# Altium PCB PI5_Robo_Board_PCB.PcbDoc (part 3 of 3)
Units mm, origin at the board's own origin, x right, y up, seen from the top; angles counter-clockwise.
Board outline 98.8 x 131.2 mm, 4 copper layers (TOP1, SIG2, SIG3, BOT4), stack 1.399 mm thick; 219 components, 149 nets, 779 pads, 462 vias.
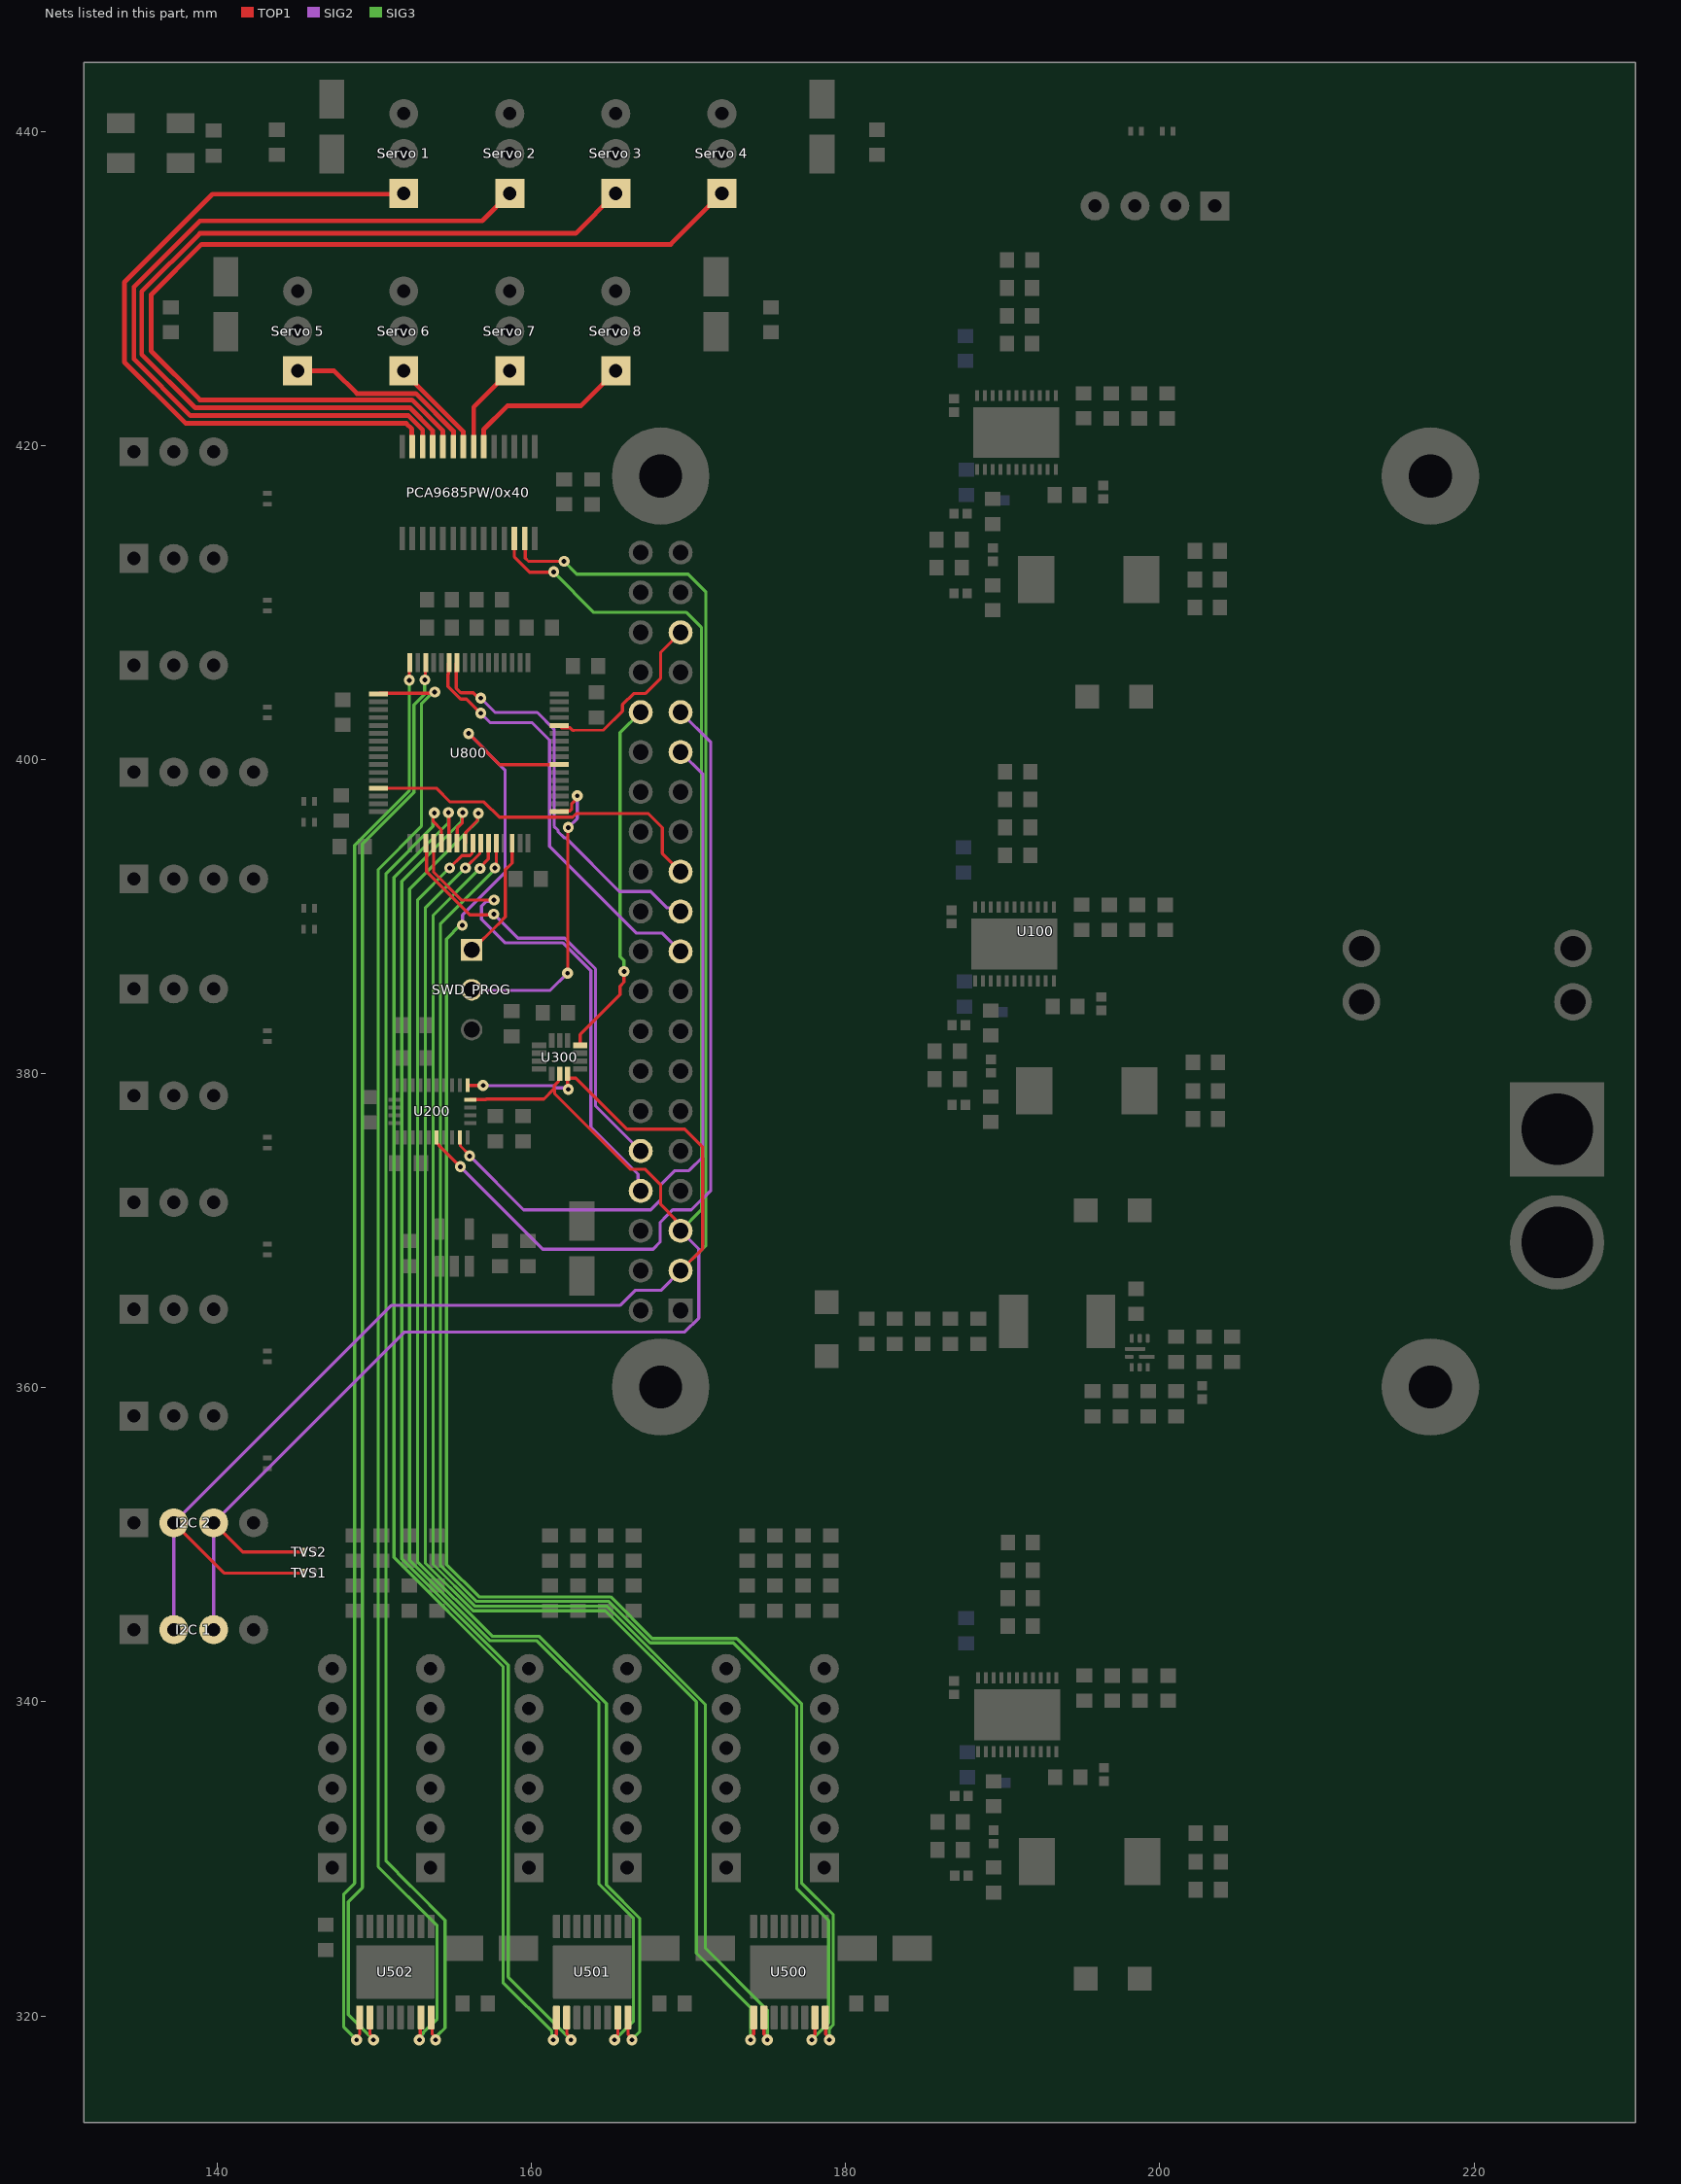
[diagram p5: the nets of this part, all layers, seen from the top]

## Via types
v1: diameter 0.7, hole 0.3, TOP1 to BOT4, tented both sides, 405 vias
v2: diameter 0.7, hole 0.3, TOP1 to BOT4, 57 vias

## Nets (pads, with @x,y where several pads share a name; then routed paths per layer and width w, separated by ;. In a path a pad name is that pad's centre, name@x,y a point inside that pad or via, vN(x,y) a via of type N, cw(c..) or ccw(c..) an arc to the next point about the centre after c; other vN are vias at no path point) (continued)
NetU100_8: U100.8 U800.36 | length 31.9
  TOP1 w0.2: U800.36@153.775,394.675 153.785,394.665 153.785,392.815 155.55,391.05 157.621,391.05 v1(157.623,391.052)
  SIG2 w0.2: v1(157.623,391.052) 157.528,390.957 157.107,390.957 156.825,390.675 156.825,389.831 158.331,388.325 162.017,388.325 163.795,386.547 163.795,376.602 166.795,373.602 166.795,372.705 U100.8@166.96,372.54
NetU100_10: U100.10 U800.35 | length 28
  TOP1 w0.2: U800.35@153.275,394.675 153.328,394.622 153.328,392.862 156.08,390.11 157.565,390.11 v1(157.608,390.153)
  SIG2 w0.2: v1(157.608,390.153) 157.622,390.153 159.15,388.625 162.128,388.625 164.085,386.668 164.085,377.955 U100.10@166.96,375.08
NetU100_19: U100.19 U800.11 | length 27.3
  TOP1 w0.2: U800.11@154.775,406.175 154.723,406.122 154.723,405.459 154.699,405.435 154.699,404.657 155.504,403.851 155.874,403.851 v1(156.775,402.95)
  SIG2 w0.2: v1(156.775,402.95) 157.375,402.35 160.044,402.35 161.158,401.236 161.158,394.479 166.695,388.942 168.338,388.942 U100.19@169.5,387.78
NetU100_21: U100.21 U800.10 | length 25.5
  TOP1 w0.2: U800.10@155.275,406.175 155.223,406.122 155.223,404.543 155.509,404.257 156.3,404.257 156.645,403.911 v1(156.781,403.911)
  SIG2 w0.2: v1(156.781,403.911) 157.692,403 160.375,403 161.448,401.927 161.448,395.752 161.7,395.5 161.7,395.403 162.081,395.022 162.178,395.022 165.6,391.6 167.6,391.6 168.646,390.554 169.266,390.554 U100.21@169.5,390.32
NetU100_23: U100.23 U800.29 | length 22.6
  TOP1 w0.2: U800.29@150.275,398.175 153.955,398.175 154.83,397.3 156.993,397.3 157.971,396.322 162.63,396.322 162.869,396.562 167.441,396.562 168.338,395.665 168.338,394.022 U100.23@169.5,392.86
NetU100_29: U100.29 U200.14 | length 46
  TOP1 w0.2: U200.14@155.458,375.936 155.483,375.911 155.483,375.395 156.063,374.814 v1(156.063,374.756)
  SIG2 w0.2: v1(156.063,374.756) 156.074,374.756 159.505,371.325 167.6,371.325 168.225,371.95 168.225,372.908 169.137,373.82 170.028,373.82 170.925,374.717 170.925,399.055 U100.29@169.5,400.48
NetU100_31: U100.31 U200.11 | length 54.1
  TOP1 w0.2: U200.11@153.958,375.936 153.983,375.911 153.983,375.599 154.133,375.449 154.133,375.416 154.653,374.896 154.654,374.896 v1(155.475,374.075)
  SIG2 w0.2: v1(155.475,374.075) 160.725,368.825 167.75,368.825 168.2,369.275 168.2,370.525 168.65,370.975 168.995,371.32 170.178,371.32 171.425,372.567 171.425,401.095 U100.31@169.5,403.02
NetU100_32: U100.32 U300.4 | length 22.9
  TOP1 w0.2: U300.4@163.11,381.88 163.11,382.485 165.65,385.025 165.65,385.573 165.9,385.823 v1(165.9,386.5)
  SIG3 w0.2: v1(165.9,386.5) 165.9,387.197 165.65,387.447 165.65,401.71 U100.32@166.96,403.02
NetU100_35: U100.35 U800.60 | length 11.6
  TOP1 w0.2: U800.60@161.775,402.175 161.829,402.122 161.927,402.027 162.455,402.027 162.623,401.859 162.707,401.859 164.597,401.885 165.8,403.088 165.8,403.5 166.088,403.788 cw(c166.96,403.02) 166.192,403.892 166.5,404.2 167.243,404.2 168.236,405.193 168.236,406.836 U100.35@169.5,408.1
NetU500_9: U500.9 U800.42 | length 92.6
  TOP1 w0.2: v1(155.8,393.1) 156.723,394.023 156.723,394.622 U800.42@156.775,394.675 ; v1@173.95,318.5 173.95,318.635 174.15,318.835 U500.9@174.15,319.9
  SIG3 w0.2: v1(155.8,393.1) 153.25,390.55 153.25,348.845 156.295,345.8 164.704,345.8 170.5,340.004 170.5,324 173.95,320.55 v1@173.95,318.5
  other v1: 173.95,318.475
NetU500_10: U500.10 U800.43 | length 92.9
  TOP1 w0.2: v1(156.73,393.07) 156.73,393.128 157.262,393.66 157.262,394.662 U800.43@157.275,394.675 ; U500.10@174.8,319.9 174.8,318.835 175.025,318.61 v1(175.025,318.475)
  SIG3 w0.2: v1(156.73,393.07) 153.75,390.09 153.75,348.755 156.415,346.09 164.824,346.09 171.075,339.839 171.075,328.128 171.075,324.325 175.025,320.375 v1(175.025,318.475)
NetU500_15: U500.15 U800.44 | length 97.9
  TOP1 w0.2: v1(157.674,393.1) 157.674,393.236 157.775,393.337 U800.44@157.775,394.675 ; v1(177.85,318.475) 177.85,318.61 178.05,318.81 U500.15@178.05,319.9
  SIG3 w0.2: v1(157.674,393.1) 157.674,392.984 154.21,389.52 154.21,348.705 156.521,346.394 164.93,346.394 167.574,343.75 172.85,343.75 176.9,339.7 176.9,328.1 178.925,326.075 178.925,319.55 v1(177.85,318.475)
NetU500_16: U500.16 U800.55 | length 112.2
  TOP1 w0.2: v1(156.01,401.66) 156.01,401.64 157.975,399.675 U800.55@161.775,399.675 ; U500.16@178.7,319.9 178.735,319.865 178.735,318.85 178.975,318.61 v1(178.975,318.475)
  SIG2 w0.2: v1(155.6,389.45) 155.625,389.475 155.625,390.1 158.325,392.8 158.325,399.344 v1(156.01,401.66)
  SIG3 w0.2: v1(155.6,389.45) 155.475,389.45 154.6,388.575 154.6,348.75 156.666,346.684 165.051,346.684 167.694,344.04 173.06,344.04 177.2,339.9 177.2,328.474 179.215,326.459 179.215,319.43 178.975,319.19 v1(178.975,318.475)
NetU501_9: U501.9 U800.38 | length 87.3
  TOP1 w0.2: v1(154.725,396.625) 154.75,396.6 154.75,394.7 U800.38@154.775,394.675 ; v1(161.4,318.475) 161.4,318.61 161.596,318.806 161.596,319.896 U501.9@161.6,319.9
  SIG3 w0.2: v1(154.725,396.625) 154.725,395.975 151.25,392.5 151.25,349.204 158.2,342.254 158.2,322.125 161.304,319.021 161.304,318.571 v1(161.4,318.475)
NetU501_10: U501.10 U800.39 | length 87.9
  TOP1 w0.2: U800.39@155.275,394.675 155.275,395.64 155.61,395.975 155.61,396.61 v1(155.625,396.625) ; U501.10@162.25,319.9 162.25,318.868 162.525,318.593 v1(162.525,318.475)
  SIG3 w0.2: v1(155.625,396.625) 155.565,396.565 155.565,396.065 151.75,392.25 151.75,349.114 158.525,342.339 158.525,322.475 v1(162.525,318.475)
NetU501_15: U501.15 U800.40 | length 91.8
  TOP1 w0.2: U800.40@155.775,394.675 155.828,394.727 155.828,395.378 156.565,396.115 156.565,396.515 v1(156.625,396.575) ; v1(165.3,318.475) 165.3,318.61 165.5,318.81 U501.15@165.5,319.9
  SIG3 w0.2: v1(156.625,396.575) 156.59,396.54 156.59,396.09 152.25,391.75 152.25,349.024 157.383,343.892 160.358,343.892 164.3,339.95 164.3,328.414 166.5,326.214 166.5,319.675 v1(165.3,318.475)
NetU501_16: U501.16 U800.41 | length 87.2
  TOP1 w0.2: v1(154.8,393.1) 155.578,393.878 156.083,393.878 156.223,394.017 156.223,394.622 U800.41@156.275,394.675 ; U501.16@166.15,319.9 166.15,318.85 166.4,318.6 v1@166.4,318.5
  SIG3 w0.2: v1(154.8,393.1) 152.75,391.05 152.75,348.935 157.503,344.182 160.478,344.182 164.775,339.885 164.775,328.349 166.9,326.224 166.9,319 v1@166.4,318.5
  other v1: 166.4,318.475
NetU502_9: U502.9 U800.16 | length 91.3
  TOP1 w0.2: v1@148.875,318.5 148.875,318.635 149.075,318.835 U502.9@149.075,319.9 ; v1(152.238,405.05) 152.238,406.137 U800.16@152.275,406.175
  SIG3 w0.2: v1@148.875,318.5 148.85,318.5 148.06,319.29 148.06,327.759 148.75,328.449 148.75,394.543 152.238,398.03 v1(152.238,405.05)
  other v1: 148.875,318.475
NetU502_10: U502.10 U800.14 | length 91.9
  TOP1 w0.2: U502.10@149.725,319.9 149.725,318.85 149.95,318.625 v1@149.95,318.5 ; v1(153.224,405.076) 153.249,405.102 153.249,406.149 U800.14@153.275,406.175
  SIG3 w0.2: v1(149.95,318.475) 148.35,320.075 148.35,327.269 149.25,328.169 149.25,394.632 152.528,397.91 152.528,403.477 153.2,404.149 153.2,405.053 v1(153.224,405.076)
NetU502_15: U502.15 U800.17 | length 94.5
  TOP1 w0.2: U800.17@150.275,404.175 150.328,404.227 153.777,404.227 v1(153.85,404.3) ; v1(152.875,318.475) 152.925,318.525 152.925,319.85 U502.15@152.975,319.9
  SIG3 w0.2: v1(152.875,318.475) 152.875,318.61 153.126,318.861 153.126,318.943 154,319.817 154,325.75 150.25,329.5 150.25,393 153,395.75 153,403.539 153.761,404.3 v1(153.85,404.3)
NetU502_16: U502.16 U800.37 | length 84.9
  TOP1 w0.2: U502.16@153.625,319.9 153.685,319.84 153.685,318.85 153.9,318.635 v1@153.9,318.5 ; v1(153.825,396.6) 153.752,396.527 153.752,396.048 154.275,395.525 U800.37@154.275,394.675
  SIG3 w0.2: v1(153.825,396.6) 153.735,396.51 153.735,395.735 150.75,392.75 150.75,329.849 152.25,328.349 152.484,328.115 154.5,326.099 154.5,319.235 154.079,318.815 154.079,318.79 153.925,318.635 153.9,318.635 v1@153.9,318.5
  other v1: 153.9,318.475
SCL: "I2C 1.3" "I2C 2.3" PCA9685PW/0x40.26 TVS2.2 U100.5 U200.19 U300.13 | length 129.2
  TOP1 w0.2: 139.78,351.4 141.641,349.539 TVS2.2@145.504,349.539 ; U200.19@156.12,378.346 157.103,378.346 157.135,378.377 160.802,378.377 161.45,379.025 ; PCA9685PW/0x40.26@158.921,414.079 158.921,412.892 159.888,411.925 161.4,411.925 v1(161.425,411.95) ; U300.13@161.8,379.994 161.725,379.918 161.725,379.506 161.45,379.231 161.45,379.025 ; U100.5@169.5,370 169.5,370.358 169.149,370.709 169.149,370.751 168.236,371.664 168.236,372.907 167.225,373.918 166.294,373.918 161.485,378.727 161.485,378.99 161.45,379.025
  SIG2 w0.2: 139.78,344.6 139.78,351.4 151.93,363.55 169.773,363.55 170.662,364.439 170.662,368.838 U100.5@169.5,370
  SIG3 w0.2: v1(161.425,411.95) 161.425,411.925 163.98,409.37 169.873,409.37 170.825,408.418 170.825,371.325 U100.5@169.5,370
SDA: "I2C 1.2" "I2C 2.2" PCA9685PW/0x40.27 TVS1.2 U100.3 U200.20 U300.14 | length 139.1
  TOP1 w0.2: 137.24,351.4 140.44,348.2 TVS1.2@145.5,348.2 ; U200.20@155.958,379.256 155.964,379.25 v1(156.925,379.25) ; PCA9685PW/0x40.27@159.581,414.079 159.609,414.051 159.609,412.826 159.815,412.62 v1(162.08,412.62) ; U300.14@162.3,379.994 162.3,379.046 v1(162.35,378.996) ; U300.14@162.375,379.715 162.835,379.715 166.092,376.458 169.765,376.458 170.9,375.323 170.9,368.86 U100.3@169.5,367.46
  SIG2 w0.2: 137.24,344.6 137.24,351.4 151.081,365.241 165.638,365.241 166.597,366.2 168.24,366.2 U100.3@169.5,367.46 ; v1(156.925,379.25) 156.938,379.237 161.385,379.237 161.53,379.092 162.254,379.092 v1(162.35,378.996)
  SIG3 w0.2: v1(162.08,412.62) 162.898,411.802 169.981,411.802 171.115,410.668 171.115,369.075 U100.3@169.5,367.46
Servo_1: "Servo 1.1" PCA9685PW/0x40.13 | length 46.4
  TOP1 w0.3: 151.875,436 139.7,436 134.1,430.4 134.1,425.3 138,421.4 152.036,421.4 152.391,421.045 152.391,419.949 PCA9685PW/0x40.13@152.419,419.921
Servo_2: "Servo 2.1" PCA9685PW/0x40.12 | length 52.3
  TOP1 w0.3: PCA9685PW/0x40.12@153.079,419.921 153.079,420.996 152.175,421.9 138.3,421.9 134.7,425.5 134.7,430.1 138.9,434.3 156.875,434.3 158.625,436.05
Servo_3: "Servo 3.1" PCA9685PW/0x40.11 | length 58.3
  TOP1 w0.3: PCA9685PW/0x40.11@153.714,419.921 153.714,420.961 152.275,422.4 138.6,422.4 135.2,425.8 135.2,429.8 138.9,433.5 162.825,433.5 165.375,436.05
Servo_4: "Servo 4.1" PCA9685PW/0x40.10 | length 64.3
  TOP1 w0.3: PCA9685PW/0x40.10@154.375,419.922 154.375,420.925 152.4,422.9 138.9,422.9 135.8,426 135.8,429.6 139,432.8 168.875,432.8 172.125,436.05
Servo_5: "Servo 5.1" PCA9685PW/0x40.9 | length 12.5
  TOP1 w0.3: 145.125,424.745 147.455,424.745 148.9,423.3 152.65,423.3 155.038,420.913 155.038,419.924 PCA9685PW/0x40.9@155.035,419.921
Servo_6: "Servo 6.1" PCA9685PW/0x40.8 | length 6.5
  TOP1 w0.3: 151.875,424.745 151.805,424.745 155.675,420.875 155.675,419.926 PCA9685PW/0x40.8@155.67,419.921
Servo_7: "Servo 7.1" PCA9685PW/0x40.7 | length 5.8
  TOP1 w0.3: PCA9685PW/0x40.7@156.33,419.921 156.33,422.45 158.625,424.745
Servo_8: "Servo 8.1" PCA9685PW/0x40.6 | length 11
  TOP1 w0.3: PCA9685PW/0x40.6@156.965,419.921 156.965,421.015 158.465,422.515 163.145,422.515 165.375,424.745
SWCLK: SWD_PROG.02 U800.49 | length 20
  TOP1 w0.2: U800.49@161.775,396.675 161.828,396.727 162.455,396.727 162.572,396.844 162.572,397.206 162.922,397.556 v2(162.922,397.691) ; v2(162.3,386.4) 162.325,386.425 162.325,395.647 v2(162.35,395.672)
  SIG2 w0.2: SWD_PROG.02@156.2,385.3 161.2,385.3 v2(162.3,386.4) ; v2(162.35,395.672) 162.922,396.244 v2(162.922,397.691)
SWDIO: SWD_PROG.01 U800.46 | length 7.9
  TOP1 w0.2: SWD_PROG.01@156.212,387.852 157.863,389.503 157.877,389.503 158.35,389.975 158.35,392.983 158.773,393.406 U800.46@158.773,394.673
pads on no net: PCA9685PW/0x40.15 PCA9685PW/0x40.16 PCA9685PW/0x40.17 PCA9685PW/0x40.18 PCA9685PW/0x40.19 PCA9685PW/0x40.20 PCA9685PW/0x40.21 PCA9685PW/0x40.22 U100.1 U100.7 U100.16 U100.17 U100.18 U100.22 U100.24 U100.26 U100.27 U100.28 U100.S1 U100.S2 U100.S3 U100.S4 U200.1 U200.7 U200.8 U200.10 U200.12 U200.13 U200.18 U200.21 U200.22 U200.23 U200.24 U200.26 U200.27 U300.9 U300.10 U300.11 U600.3 U601.4 U800.5 U800.6 U800.20 U800.21 U800.23 U800.25 U800.28 U800.33 U800.45 U800.50

## Polygon pours and split planes (outlines as drawn)
NetCboot720_1 on TOP1 "NETCBOOT720_1_L01_P649" (solid, remove dead copper, pour order 649): 190.752,337.225 190.752,334.28 190.752,326.46 191.337,325.875 194.652,325.875 195.102,326.325 195.102,333.7 193.877,334.925 193.877,336.95 193.602,337.225
NetCboot710_1 on TOP1 "NETCBOOT710_1_L01_P648" (solid, remove dead copper, pour order 648): 190.577,386.3 190.577,383.355 190.577,375.535 191.162,374.95 194.477,374.95 194.927,375.4 194.927,382.775 193.702,384 193.702,386.025 193.427,386.3
NetCboot700_1 on TOP1 "NETCBOOT700_1_L01_P647" (solid, remove dead copper, pour order 647): 190.7,418.875 190.7,415.93 190.7,408.11 191.285,407.525 194.6,407.525 195.05,407.975 195.05,415.35 193.825,416.575 193.825,418.6 193.55,418.875
+6c on TOP1 "TOP1-+6c" (solid, remove dead copper, pour order 749): 150.798,314.852 152.15,313.5 189.525,313.5 196.5,320.475 196.5,323.575 195,325.075 186.925,325.075 184,328 178.454,328 178.454,324.929 178.946,324.929 179.367,325.35 182.5,325.35 182.5,322.1 181.7,321.3 181.7,320.3 179.3,317.9 177.054,317.9 176.325,319.152 176.325,320.649 175.876,320.649 175.873,320.646 175.873,318.398 175.375,317.9 173.7,317.9 173.35,318.25 173.35,326.15 171.5,328 165.904,328 165.904,324.929 166.396,324.929 166.817,325.35 170,325.35 170,322.15 169.15,321.3 169.15,320.3 166.75,317.9 164.504,317.9 163.775,319.152 163.775,320.649 163.326,320.649 163.323,320.646 163.323,319.136 163.323,318.348 162.875,317.9 161.125,317.9 160.825,318.2 160.825,326.175 159,328 153.379,328 153.379,324.929 153.871,324.929 154.292,325.35 157.5,325.35 157.5,322.175 156.625,321.3 156.625,320.3 154.225,317.9 151.979,317.9 151.25,319.152 151.25,320.649 150.801,320.649 150.798,320.646
GND on TOP1 "GND_L01_P721" (solid, remove dead copper, pour order 721): 157.375,420.725 157.375,419 156.875,418.5 152.647,418.5 152.037,419.11 152.037,420.731 151.531,420.731 151.531,415.345 151.705,415.171 156.432,415.171 156.713,414.89 156.713,414.889 156.713,413.267 158.539,413.267 158.539,414.89 160.924,417.275 164.325,417.275 164.325,418.2 161.8,420.725
+6b on TOP1 "TOP1-No Net" (solid, remove dead copper, pour order 718): 180.7,367.9 195,367.9 196.5,369.4 196.5,372.5 195,374 188.6,374 177.8,384.8 177.8,425.25 175.75,427.3 175.75,427.8 173.45,427.8 172.65,428.6 170.85,428.6 170.588,428.338 141.712,428.338 141.45,428.6 139.65,428.6 138.85,427.8 136.55,427.8 136.55,426.8 137.55,426.8 138.45,425.9 141.45,425.9 141.65,426.1 166.5,426.1 166.5,424.8 169.11,422.19 171.5,419.8 171.5,377.1
Battery on TOP1 "TOP1-Battery" (solid, remove dead copper, pour order 697): 190.573,391 190.577,390.996 190.577,390.2 190.602,390.175 207.075,390.175 207.4,389.85 207.4,368.2 206.925,367.725 199.65,367.725 199.65,364.473 198.599,363.423 198.599,362.875 199.35,362.875 199.526,362.7 206.925,362.7 207.4,362.225 207.4,352.523 205.502,350.625 191.352,350.625 191.352,349.675 192.827,349.675 193.652,348.85 193.652,344.475 190.752,341.925 190.748,341.925 190.752,341.921 190.752,341.125 190.777,341.1 216.65,341.1 218.8,343.25 218.8,429.2 215.725,432.275 206.475,432.275 204.525,434.225 204.525,436.275 202.475,436.275 202.475,434.225 200.525,432.275 191.3,432.275 191.3,431.325 192.775,431.325 193.6,430.5 193.6,426.125 190.7,423.575 190.696,423.575 190.7,423.571 190.7,422.775 190.725,422.75 207.25,422.75 207.65,422.35 207.65,402.023 205.327,399.7 191.177,399.7 191.177,398.75 192.652,398.75 193.477,397.925 193.477,393.55 190.577,391
+5 on TOP1 "+5_L01_P694" (solid, remove dead copper, pour order 694): 180.4,362.9 180.4,358 174.275,351.875 163.125,351.875 158.9,356.1 158.9,368 159.4,368.5 164.587,368.5 168.2,368.5 168.2,362.9
GND on TOP1 "GND_L01_P673" (solid, remove dead copper, pour order 673): 186.681,340.85 193.727,340.85 193.877,340.7 207.077,340.7 207.077,326.525 206.427,325.875 203.952,325.875 203.327,326.5 203.327,332.325 200.352,335.429 196.055,335.429 193.979,337.505 188.14,337.505 186.5,339.146 186.5,340.847 186.681,340.85
GND on TOP1 "GND_L01_P672" (solid, remove dead copper, pour order 672): 186.506,389.925 193.552,389.925 193.777,389.7 206.902,389.7 206.902,375.6 206.252,374.95 203.777,374.95 203.152,375.575 203.152,381.4 200.177,384.504 195.88,384.504 193.804,386.58 187.965,386.58 186.35,388.196 186.35,389.923 186.506,389.925
GND on TOP1 "GND_L01_P671" (solid, remove dead copper, pour order 671): 186.629,422.5 193.675,422.5 193.875,422.3 207.025,422.3 207.025,408.175 206.375,407.525 203.9,407.525 203.275,408.15 203.275,413.975 200.3,417.079 196.003,417.079 193.927,419.155 188.088,419.155 186.528,420.715 186.528,422.498 186.629,422.5
NetCvcc720_1 on TOP1 "NETCVCC720_1_L01_P643" (solid, remove dead copper, pour order 643): 189.6,341.1 189.251,341.1 189.251,342.124 188.75,342.625 188.75,349.825 189.6,350.675 190.9,350.675 190.9,348.85 190.9,347.9 190.45,347.9 189.375,346.825 189.375,343.75 189.594,343.531
NetCvcc710_1 on TOP1 "NETCVCC710_1_L01_P642" (solid, remove dead copper, pour order 642): 189.425,390.175 189.076,390.175 189.076,391.199 188.575,391.7 188.575,398.9 189.425,399.75 190.725,399.75 190.725,397.925 190.725,396.975 190.275,396.975 189.2,395.9 189.2,392.825 189.419,392.606
NetCvcc700_1 on TOP1 "NETCVCC700_1_L01_P641" (solid, remove dead copper, pour order 641): 189.548,422.75 189.199,422.75 189.199,423.774 188.698,424.275 188.698,431.475 189.548,432.325 190.848,432.325 190.848,430.5 190.848,429.55 190.398,429.55 189.323,428.475 189.323,425.4 189.542,425.181
NetCcomp700_2 on TOP1 "TOP1-NetCcomp700_2" (solid, remove dead copper, pour order 693): 195.775,406.725 197.5,405 197.5,400.6 201.2,400.6 202.8,402.2 202.8,413.75 201.125,415.425 196.229,415.425 195.778,414.974 195.775,407.975
GND on TOP1 "GND_L01_P729" (solid, remove dead copper, pour order 729): 154.329,325.199 154.329,324.978 153.85,324.499 153.849,324.5 148.85,324.5 148.85,321.1 153.85,321.1 154.625,320.325 156.2,320.325 156.2,322.325 157.025,323.15 157.025,325.2
GND on TOP1 "GND_L01_P728" (solid, remove dead copper, pour order 728): 166.854,325.199 166.854,324.978 166.375,324.499 166.374,324.5 161.375,324.5 161.375,321.1 166.375,321.1 167.15,320.325 168.725,320.325 168.725,322.325 169.55,323.15 169.55,325.2
+3.3 on TOP1 "+3.3_L01_P722" (solid, remove dead copper, pour order 722): 164.35,416.825 161.6,416.825 159.965,415.19 159.965,413.27 161.77,413.27 164.35,415.85
+3.3 on TOP1 "+3.3_L01_P753" (solid, remove dead copper, pour order 753): 133.725,420.575 135.675,420.575 135.675,343.625 133.725,343.625
GND on TOP1 "GND_L01_P695" (solid, remove dead copper, pour order 695): 164.142,371.985 165.127,371 168.2,371 168.2,368.8 157.525,368.8 157.525,369.7 160.797,371.997
GND on TOP1 "GND_L01_P727" (solid, remove dead copper, pour order 727): 179.404,325.199 179.404,324.978 178.925,324.499 178.924,324.5 173.925,324.5 173.925,321.1 178.925,321.1 179.7,320.325 181.275,320.325 181.275,322.325 182.1,323.15 182.1,325.2
NetCcomp720_2 on TOP1 "TOP1-NetCcomp700_2" (solid, remove dead copper, pour order 725): 195.827,325.075 197.552,323.35 197.552,318.95 201.252,318.95 202.852,320.55 202.852,332.1 201.177,333.775 196.281,333.775 195.83,333.324 195.827,326.325
GND on TOP1 "GND_L01_P678" (solid, remove dead copper, pour order 678): 198.674,362.101 198.676,362.099 198.676,361.85 199.35,361.85 199.9,361.3 202.695,361.3 203.397,360.597 203.397,357.847 202.275,356.725 192.9,356.725 189.4,360.225 189.4,361.925 188.9,362.425 188.9,363.35 180.9,363.35 180.925,363.325 180.925,362.45 189.875,353.5 206.875,353.5 206.875,361.825 206.5,362.2 199.225,362.2 199.126,362.101
+6a on TOP1 "TOP1-+6a" (solid, remove dead copper, pour order 714): 173.25,436.135 178.3,431.085 178.3,403.5 181.2,400.6 195.1,400.6 196.6,402.1 196.6,405.2 195.1,406.7 188.7,406.7 184.6,410.8 184.6,437 182.5,439.1 180.2,439.1 179.4,439.9 177.6,439.9 177.338,439.638 148.462,439.638 148.2,439.9 146.4,439.9 145.6,439.1 143.3,439.1 143.3,438.1 144.3,438.1 145.2,437.2 148.2,437.2 148.4,437.4 173.25,437.4
NetCcomp710_2 on TOP1 "TOP1-NetCcomp700_2" (solid, remove dead copper, pour order 710): 195.652,374.15 197.377,372.425 197.377,368.025 201.077,368.025 202.677,369.625 202.677,381.175 201.002,382.85 196.106,382.85 195.655,382.399 195.652,375.4
GND on TOP1 "GND_L01_P706" (solid, remove dead copper, pour order 706): 136.55,429.2 136.55,428.2 138.45,428.2 139.65,429.4 141.45,429.4 142.15,428.7 170.15,428.7 170.85,429.4 172.65,429.4 173.85,428.2 175.75,428.2 175.75,429.2 172.85,432.1 139.45,432.1
GND on TOP1 "GND_L01_P705" (solid, remove dead copper, pour order 705): 143.3,440.5 143.3,439.5 145.2,439.5 146.4,440.7 148.2,440.7 148.9,440 176.9,440 177.6,440.7 179.4,440.7 180.6,439.5 182.5,439.5 182.5,440.5 179.6,443.4 146.2,443.4
GND on TOP1 "GND_L01_P636" (solid, remove dead copper, pour order 636): 191.298,426 191.298,430.5 193.023,430.5 193.023,426 193.02,425.997
GND on TOP1 "GND_L01_P637" (solid, remove dead copper, pour order 637): 191.175,393.425 191.175,397.925 192.9,397.925 192.9,393.425 192.897,393.422
GND on TOP1 "GND_L01_P638" (solid, remove dead copper, pour order 638): 191.35,344.35 191.35,348.85 193.075,348.85 193.075,344.35 193.072,344.347
NetCboot600_2 on TOP1 "NETCBOOT600_2_L01_P639" (solid, remove dead copper, pour order 639): 199.125,362.375 199.125,362.575 199.05,362.65 198.025,362.65 197.725,362.95 197.725,365.425 198,365.7 199,365.7 199,366.7 195.95,366.7 195.25,366 195.25,362.45 195.4,362.3 199.05,362.3
GND on TOP1 "GND_L01_P640" (solid, remove dead copper, pour order 640): 199.75,358.75 195.25,358.75 195.25,357.05 199.75,357.05
NetFbat_1_1 on TOP1 "NETFBAT_1_1_L01_P644" (solid, remove dead copper, pour order 644): 222.292,373.45 220.292,375.45 220.292,389.45 222.292,391.45 228.292,391.45 230.292,389.45 230.292,375.45 228.292,373.45
NetCff600_1 on TOP1 "TOP1-NetCff600_1" (solid, remove dead copper, pour order 645): 177.95,364.625 178.725,363.85 188.875,363.85 189.7,362.45 191.7,362.45 191.7,366 190.2,367.5 179.175,367.5 177.95,366.275
GND on TOP1 "GND_L01_P629" (solid, remove dead copper, pour order 629): 132.97,441.16 132.975,441.165 139.464,441.165 140.22,440.41 140.22,439.51 139.32,439.51 138.94,439.89 132.974,439.89 132.975,439.925
NetC102_1 on TOP1 "NETC102_1_L01_P628" (solid, remove dead copper, pour order 628): 132.975,437.35 132.98,437.345 139.47,437.345 140.225,438.1 140.225,439 139.325,439 138.945,438.62 132.98,438.62 132.98,438.585
GND on BOT4 "GND_L04_P755" (solid, remove dead copper, pour order 755): 230.292,408.408 230.292,442.992 230.292,444.4 131.5,444.4 131.5,313.2 230.51,313.2
GND on BOT4 "BOT4-GND" (solid, remove dead copper, pour order 752): 189.8,325.8 206.352,325.8 230.292,349.74 230.292,375.45 228.292,373.45 222.292,373.45 220.292,375.45 220.292,389.45 222.292,391.45 228.292,391.45 230.292,389.45 230.292,408.408 206.375,432.325 189.525,432.325 180.925,423.725 180.925,334.675
GND on BOT4 "GND_L04_P733" (solid, remove dead copper, pour order 733): 180.925,334.675 180.925,328.45 179.875,327.4 149.125,327.4 148.5,326.775 148.5,319.25 148.85,318.9 182.9,318.9 190.3,326.3 190.3,334.175
NetCboot720_1 on BOT4 "NETCBOOT720_1_L04_P655" (solid, remove dead copper, pour order 655): 190.752,337.225 190.752,334.28 190.752,326.46 191.337,325.875 194.652,325.875 195.102,326.325 195.102,333.7 193.877,334.925 193.877,336.95 193.602,337.225
NetCboot710_1 on BOT4 "NETCBOOT710_1_L04_P654" (solid, remove dead copper, pour order 654): 190.577,386.3 190.577,383.355 190.577,375.535 191.162,374.95 194.477,374.95 194.927,375.4 194.927,382.775 193.702,384 193.702,386.025 193.427,386.3
NetCboot700_1 on BOT4 "NETCBOOT700_1_L04_P653" (solid, remove dead copper, pour order 653): 190.7,418.875 190.7,415.93 190.7,408.11 191.285,407.525 194.6,407.525 195.05,407.975 195.05,415.35 193.825,416.575 193.825,418.6 193.55,418.875
NetCcomp700_2 on BOT4 "NETCCOMP700_2_L04_P665" (solid, remove dead copper, pour order 665): 195.775,407.975 196.225,407.525 202.175,407.525 202.8,408.15 202.8,413.75 201.125,415.425 196.229,415.425 195.778,414.974
NetCcomp710_2 on BOT4 "NETCCOMP710_2_L04_P666" (solid, remove dead copper, pour order 666): 195.652,375.4 196.102,374.95 202.052,374.95 202.677,375.575 202.677,381.175 201.002,382.85 196.106,382.85 195.655,382.399
NetCcomp720_2 on BOT4 "NETCCOMP720_2_L04_P667" (solid, remove dead copper, pour order 667): 195.827,326.325 196.277,325.875 202.227,325.875 202.852,326.5 202.852,332.1 201.177,333.775 196.281,333.775 195.83,333.324
NetFbat_1_1 on BOT4 "NETFBAT_1_1_L04_P691" (solid, remove dead copper, pour order 691): 222.292,373.45 220.292,375.45 220.292,389.45 222.292,391.45 228.292,391.45 230.292,389.45 230.292,375.45 228.292,373.45
NetCboot720_1 on SIG3 "NETCBOOT720_1_L03_P658" (solid, remove dead copper, pour order 658): 190.752,337.225 190.752,334.28 190.752,326.46 191.337,325.875 194.652,325.875 195.102,326.325 195.102,333.7 193.877,334.925 193.877,336.95 193.602,337.225
NetCboot710_1 on SIG3 "NETCBOOT710_1_L03_P657" (solid, remove dead copper, pour order 657): 190.577,386.3 190.577,383.355 190.577,375.535 191.162,374.95 194.477,374.95 194.927,375.4 194.927,382.775 193.702,384 193.702,386.025 193.427,386.3
NetCboot700_1 on SIG3 "NETCBOOT700_1_L03_P656" (solid, remove dead copper, pour order 656): 190.7,418.875 190.7,415.93 190.7,408.11 191.285,407.525 194.6,407.525 195.05,407.975 195.05,415.35 193.825,416.575 193.825,418.6 193.55,418.875
Battery on SIG3 "SIG3-Battery" (solid, remove dead copper, pour order 683): 190.573,391 190.577,390.996 190.577,390.2 190.602,390.175 207.075,390.175 207.4,389.85 207.4,368.2 206.925,367.725 199.65,367.725 199.65,364.473 198.599,363.423 198.599,362.875 199.35,362.875 199.526,362.7 206.925,362.7 207.4,362.225 207.4,352.523 205.502,350.625 191.352,350.625 191.352,349.675 192.827,349.675 193.652,348.85 193.652,344.475 190.752,341.925 190.748,341.925 190.752,341.921 190.752,341.125 190.777,341.1 216.65,341.1 218.8,343.25 218.8,429.2 215.725,432.275 191.3,432.275 191.3,431.325 192.775,431.325 193.6,430.5 193.6,426.125 190.7,423.575 190.696,423.575 190.7,423.571 190.7,422.775 190.725,422.75 207.25,422.75 207.65,422.35 207.65,402.023 205.327,399.7 191.177,399.7 191.177,398.75 192.652,398.75 193.477,397.925 193.477,393.55 190.577,391
NetCff600_1 on SIG3 "SIG3-NetCff600_1" (solid, remove dead copper, pour order 646): 178.15,364.425 178.725,363.85 188.875,363.85 189.7,362.45 191.7,362.45 191.7,366 189.975,367.725 179.401,367.725 177.951,366.275 177.95,366.275 177.95,364.634 177.947,364.628 178.15,364.425
NetCcomp700_2 on SIG3 "NETCCOMP700_2_L03_P668" (solid, remove dead copper, pour order 668): 195.775,407.975 196.225,407.525 202.175,407.525 202.8,408.15 202.8,413.75 201.125,415.425 196.229,415.425 195.778,414.974
NetCcomp710_2 on SIG3 "NETCCOMP710_2_L03_P669" (solid, remove dead copper, pour order 669): 195.652,375.4 196.102,374.95 202.052,374.95 202.677,375.575 202.677,381.175 201.002,382.85 196.106,382.85 195.655,382.399
NetCcomp720_2 on SIG3 "NETCCOMP720_2_L03_P670" (solid, remove dead copper, pour order 670): 195.827,326.325 196.277,325.875 202.227,325.875 202.852,326.5 202.852,332.1 201.177,333.775 196.281,333.775 195.83,333.324
NetFbat_1_1 on SIG3 "NETFBAT_1_1_L03_P687" (solid, remove dead copper, pour order 687): 222.292,373.45 220.292,375.45 220.292,389.45 222.292,391.45 228.292,391.45 230.292,389.45 230.292,375.45 228.292,373.45
GND on SIG2 "SIG2-GND" (solid, remove dead copper, pour order 751): 189.8,325.8 206.352,325.8 230.292,349.74 230.292,375.45 228.292,373.45 222.292,373.45 220.292,375.45 220.292,389.45 222.292,391.45 228.292,391.45 230.292,389.45 230.292,408.408 206.375,432.325 189.525,432.325 180.925,423.725 180.925,334.675
NetCboot720_1 on SIG2 "NETCBOOT720_1_L02_P652" (solid, remove dead copper, pour order 652): 190.752,337.225 190.752,334.28 190.752,326.46 191.337,325.875 194.652,325.875 195.102,326.325 195.102,333.7 193.877,334.925 193.877,336.95 193.602,337.225
NetCboot710_1 on SIG2 "NETCBOOT710_1_L02_P651" (solid, remove dead copper, pour order 651): 190.577,386.3 190.577,383.355 190.577,375.535 191.162,374.95 194.477,374.95 194.927,375.4 194.927,382.775 193.702,384 193.702,386.025 193.427,386.3
NetCboot700_1 on SIG2 "NETCBOOT700_1_L02_P650" (solid, remove dead copper, pour order 650): 190.7,418.875 190.7,415.93 190.7,408.11 191.285,407.525 194.6,407.525 195.05,407.975 195.05,415.35 193.825,416.575 193.825,418.6 193.55,418.875
NetCcomp700_2 on SIG2 "NETCCOMP700_2_L02_P662" (solid, remove dead copper, pour order 662): 195.775,407.975 196.225,407.525 202.175,407.525 202.8,408.15 202.8,413.75 201.125,415.425 196.229,415.425 195.778,414.974
NetCcomp710_2 on SIG2 "NETCCOMP710_2_L02_P663" (solid, remove dead copper, pour order 663): 195.652,375.4 196.102,374.95 202.052,374.95 202.677,375.575 202.677,381.175 201.002,382.85 196.106,382.85 195.655,382.399
NetCcomp720_2 on SIG2 "NETCCOMP720_2_L02_P664" (solid, remove dead copper, pour order 664): 195.827,326.325 196.277,325.875 202.227,325.875 202.852,326.5 202.852,332.1 201.177,333.775 196.281,333.775 195.83,333.324
NetFbat_1_1 on SIG2 "NETFBAT_1_1_L02_P689" (solid, remove dead copper, pour order 689): 222.292,373.45 220.292,375.45 220.292,389.45 222.292,391.45 228.292,391.45 230.292,389.45 230.292,375.45 228.292,373.45

## Keep-outs
Keep-Out Layer:
  the board outline again, w0.127

## Silkscreen, mask and mechanical layers (free items; w line width, h text height)
Top Overlay:
  text "Projektarbeit / PI5 Extenstion Board/HAT / - Christoph Hackl / - Moritz Klein" at 213.1,434.5 h1
  text "Servo Wandler 2 / 12V->6V/10A" at 195.525,428.75 h2
  text "Servo Wandler 1 / 12V->6V/10A" at 195.3,396.05 h2
  text "SWDIO" at 151.8,387.611 h1
  text "SWCLK" at 151.6,385.011 h1
  text "PI Wandler / 12V->5V/6A" at 202.8,364.4 h2
  text "Motor Wandler / 12V->6V/10A" at 195.5,347.25 h2
  text "Motortreiber / DRV8411APWPR" at 160.5,314.75 h1.5
  text "Projektarbeit / PI5 Extenstion Board/HAT / - Christoph Hackl / - Moritz Klein" at 131.908,313.608 h1
Bottom Overlay:
  text "Projektarbeit / PI5 Extenstion Board/HAT / - Christoph Hackl / - Moritz Klein" at 229.75,434.5 h1
  text "Projektarbeit / PI5 Extenstion Board/HAT / - Christoph Hackl / - Moritz Klein" at 148.5,313.75 h1
Kontur:
  the board outline again, w0.127

## Dimensions
131.5,444.4 to 230.225,444.8 on Bemassung
230.3,444.4 to 230.3,313.2 on Bemassung